# Altium PCB NB2DSK01.PcbDoc (part 10 of 17)
Units mil, origin at the board's own origin, x right, y up, seen from the top; angles counter-clockwise.
Board outline 11815 x 6500.03 mil, 8 copper layers (Top Layer, MidLayer1, MidLayer2, GND, PWR, MidLayer3, MidLayer4, Bottom Layer), stack 74.62 mil thick; 798 components, 1002 nets, 3927 pads, 3182 vias.
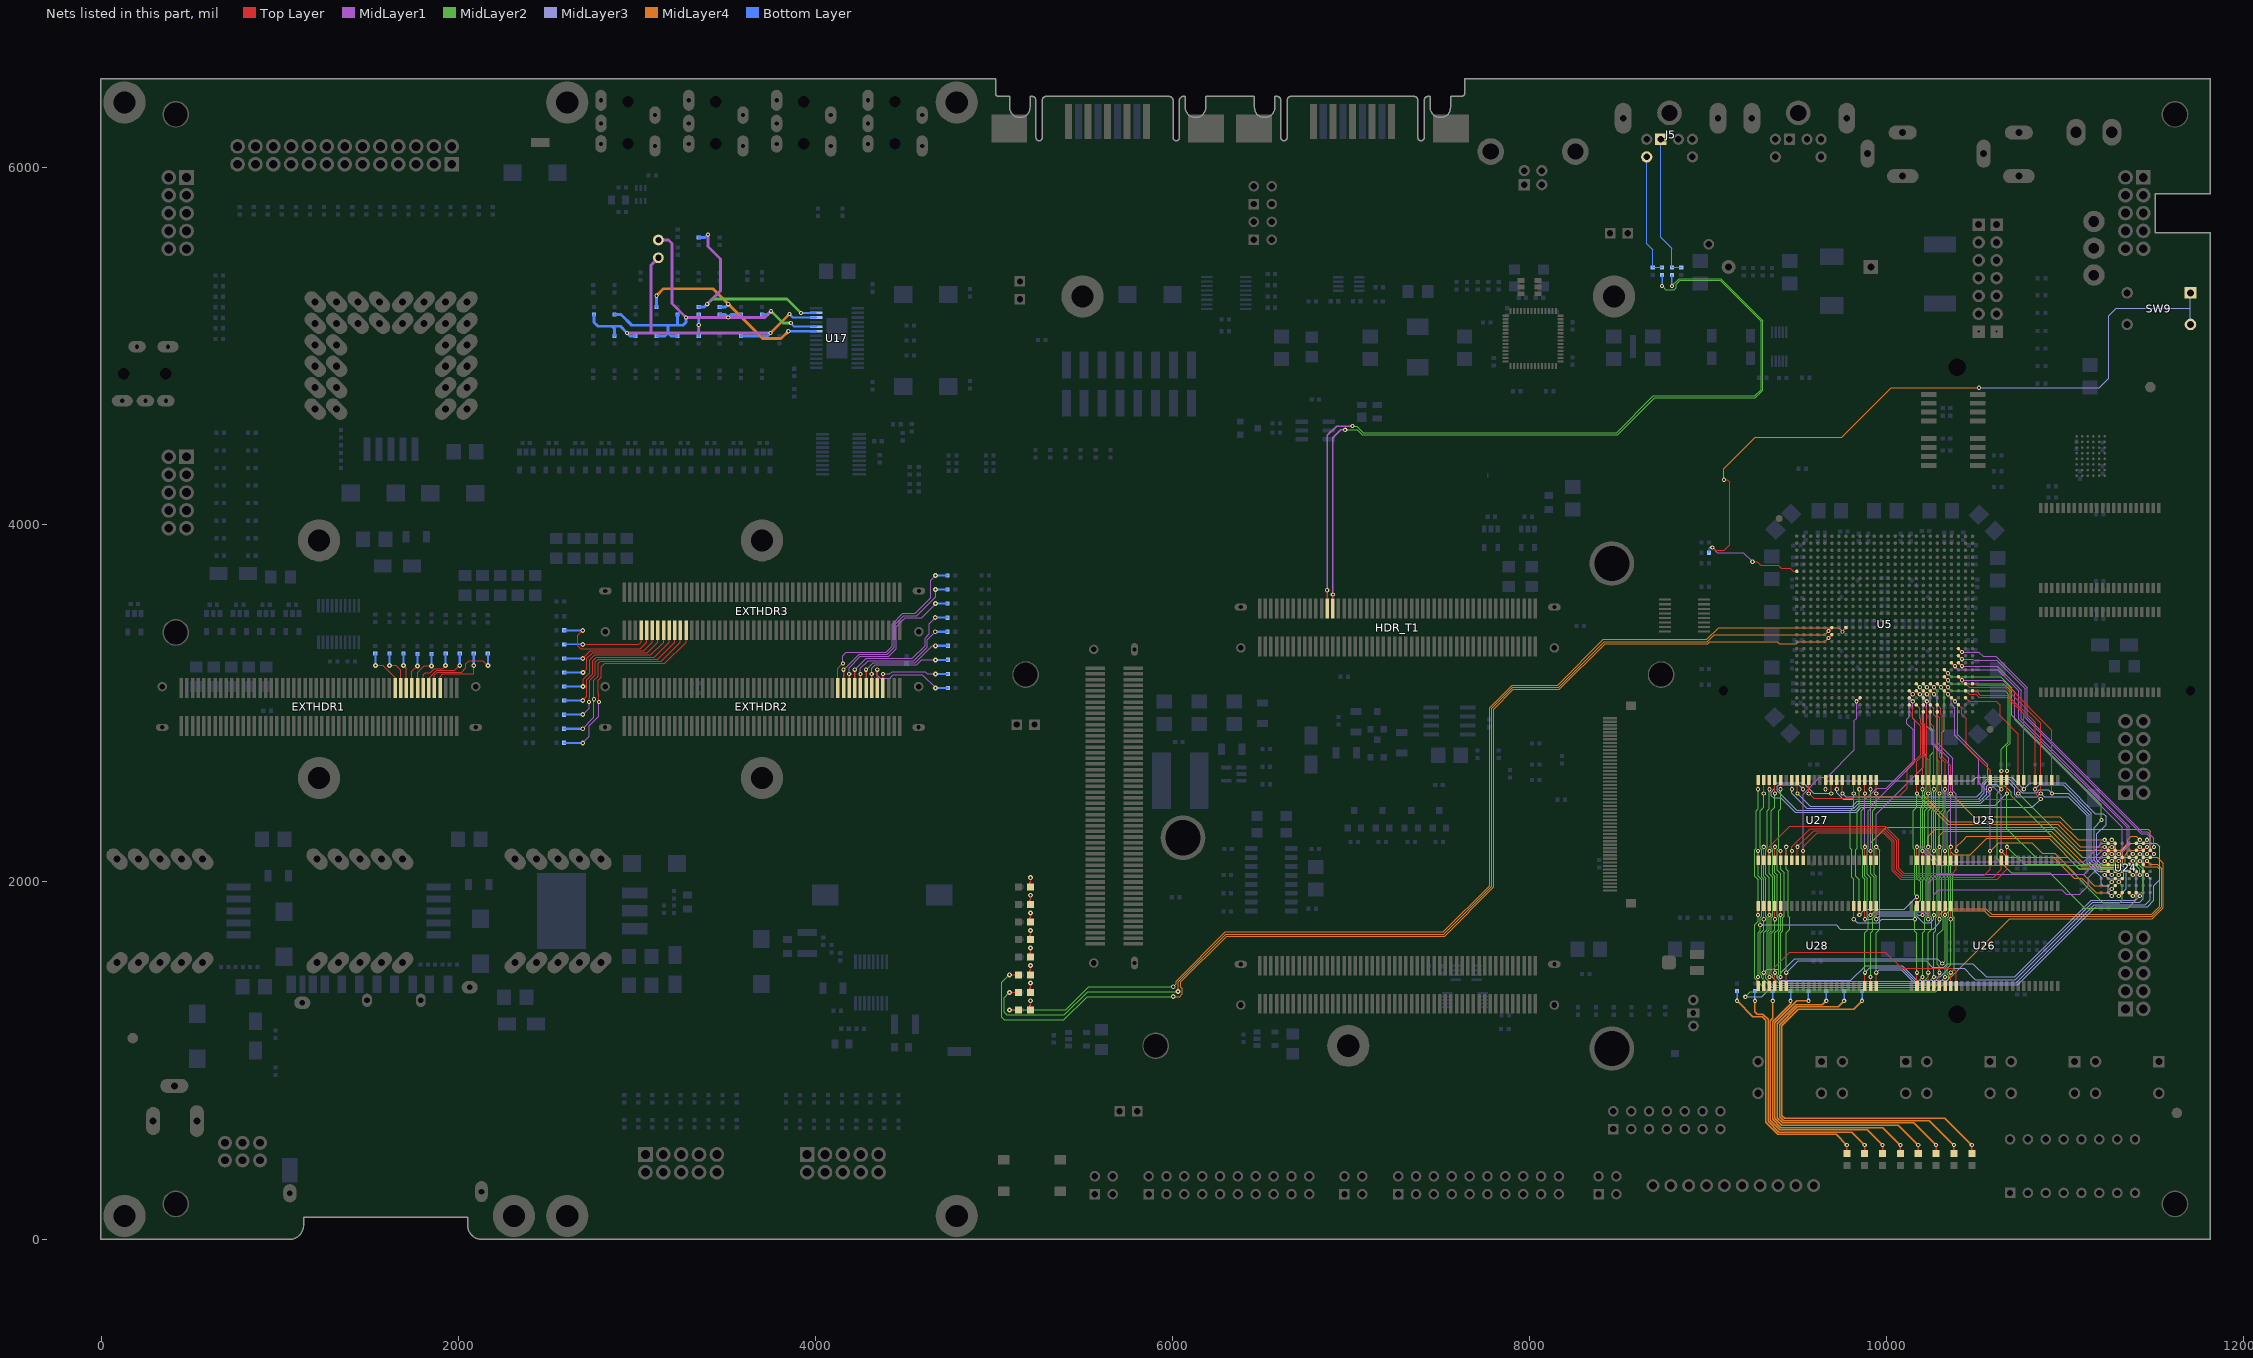
[diagram p16: the nets of this part, all layers, seen from the top]

## Via types
v1: diameter 23.62, hole 11.81, Top Layer to Bottom Layer, tented both sides, 1950 vias
v2: diameter 27.56, hole 11.81, Top Layer to Bottom Layer, tented both sides, 679 vias
v3: diameter 23.62, hole 11.81, Top Layer to Bottom Layer, 194 vias
v4: diameter 31.5, hole 11.81, Top Layer to Bottom Layer, tented both sides, 178 vias
v5: diameter 21.65, hole 11.81, Top Layer to Bottom Layer, tented both sides, 67 vias
v6: diameter 23.62, hole 11.81, Top Layer to Bottom Layer, tented bottom, 53 vias
v7: diameter 26, hole 11.81, Top Layer to Bottom Layer, tented both sides, 21 vias
v8: diameter 26, hole 11.81, Top Layer to Bottom Layer, 13 vias
v9: diameter 28, hole 11.81, Top Layer to Bottom Layer, 8 vias
v10: diameter 25.59, hole 11.81, Top Layer to Bottom Layer, tented both sides, 7 vias
v11: diameter 39.37, hole 11.81, Top Layer to Bottom Layer, tented both sides, 5 vias
v12: diameter 30, hole 11.81, Top Layer to Bottom Layer, 3 vias
v13: diameter 30, hole 11.81, Top Layer to Bottom Layer, tented both sides, 2 vias
v14: diameter 23, hole 11.81, Top Layer to Bottom Layer, tented both sides, 1 vias
v15: diameter 26.56, hole 11.81, Top Layer to Bottom Layer, tented both sides, 1 vias

## Nets (pads, with @x,y where several pads share a name; then routed paths per layer and width w, separated by ;. In a path a pad name is that pad's centre, name@x,y a point inside that pad or via, vN(x,y) a via of type N, cw(c..) or ccw(c..) an arc to the next point about the centre after c; other vN are vias at no path point) (continued)
HOST_LED.L5: LED6.1 U5.R6 | length 6500.6
  Top Layer w5: v2(5086.22,1480.32) LED6.1@5137.8,1480.32
  Top Layer w7.87: v1(9673.23,3366.14) U5.R6@9692.91,3385.83
  MidLayer2 w5: v2(5086.22,1480.32) 5043.59,1437.69 5043.59,1241.49 5057.38,1227.7 5391.93,1227.7 5522.5,1358.27 v2(6003.94,1358.27)
  MidLayer4 w5: v2(6003.94,1358.27) 6039.37,1358.27 6055.12,1374.02 6055.12,1401.58 6047.24,1409.45 6047.24,1440.95 6303.15,1696.85 7523.62,1696.85 7799.21,1972.44 7799.21,2968.5 7909.45,3078.74 8167.03,3078.74 8422.94,3334.65 8996.07,3334.65 9007.88,3346.46 9385.83,3346.46 9397.64,3334.65 9413.39,3334.65 9433.07,3334.65 9492.13,3334.65 9503.94,3346.46 9653.54,3346.46 v1(9673.23,3366.14)
HOST_LED.L6: LED7.1 U5.P6 | length 6342.4
  Top Layer w5: v2(5086.22,1381.89) LED7.1@5137.8,1381.89 ; v2@5090.55,1374.02 v2@5098.43,1381.89
  Top Layer w7.87: v1(9673.23,3405.51) U5.P6@9692.91,3425.2
  MidLayer2 w5: v2(5086.22,1381.89) 5057.38,1353.05 5057.38,1270.65 5072.75,1255.28 5393.51,1255.28 5524.05,1385.83 v2(6031.5,1385.83)
  MidLayer4 w5: v2(6031.5,1385.83) 6031.5,1440.95 6299.21,1708.66 7519.69,1708.66 7787.4,1976.38 7787.4,2972.44 7905.51,3090.55 8162.14,3090.55 8418.05,3346.46 8993.74,3346.46 9033.11,3385.83 9417.32,3385.83 9433.07,3385.83 9653.54,3385.83 v1(9673.23,3405.51)
HOST_LED.L7: LED8.1 U5.P8 | length 6234.9
  Top Layer w5: v2(5086.22,1283.47) LED8.1@5137.8,1283.47
  Top Layer w7.87: v5@9751.97,3405.51 U5.P8@9771.65,3425.2
  MidLayer2 w5: v2(5086.22,1283.47) 5400.69,1283.47 5530.61,1413.39 v2(6003.94,1413.39)
  MidLayer4 w5: v2(6003.94,1413.39) 6019.69,1429.13 6019.69,1444.88 6295.28,1720.47 7515.75,1720.47 7775.59,1980.32 7775.59,2976.38 7901.57,3102.36 8157.25,3102.36 8413.15,3358.27 8991.41,3358.27 9058.34,3425.2 9417.32,3425.2 9433.07,3425.2 9732.28,3425.2 v5@9751.97,3403.15
  other v5: 9751.97,3401.58
HOST_RESET_SW: R159.2 SW9.1 SW9.2 U5.F1 | length 4508.5
  Top Layer w5: v1(9023.23,3873.62) 9038.4,3858.45 9089.45,3858.45 9120,3889 9120,4241 9108,4253 v1(9088,4253) ; v2(9248.8,3793.33) 9274.66,3793.33 9294.54,3773.45 9391.68,3773.45 9409.23,3755.91 9460.63,3755.91 9476.38,3740.16 U5.F1@9496.06,3740.16
  MidLayer1 w5: v1(9023.23,3873.62) 9051.85,3845 9197.13,3845 v2(9248.8,3793.33)
  MidLayer4 w5: v1(9088,4253) 9088,4315 9264,4491 9749,4491 10026,4768 v1(10517,4768)
  MidLayer3 w5: v1(10517,4768) 11190,4768 11243,4821 11243,5171 11286,5214 11700.79,5214 ; SW9.2@11700.79,5122.51 SW9.1@11700.79,5299.67
  Bottom Layer w5: R159.2@9004.46,3843.38 9004.46,3869.06 9009.02,3873.62 v1(9023.23,3873.62)
IN.LEFT: R109.2 R112.2 R113.2 R114.2 R115.2 R116.1 TP13.1 U17.12 | length 2249.7
  MidLayer1 w15.75: v1(2944.88,5074.8) 3078.8,5074.8 ; TP13.1@3120.73,5495.67 3078.8,5453.74 3078.8,5074.8 ; 3346.46,5076.95 v1(3346.46,5119.64) ; v1(3748.03,5074.8) 3078.8,5074.8
  MidLayer4 w15.75: v1(3748.03,5074.8) v1(3854.33,5181.1)
  Bottom Layer w11.81: v1(3854.33,5181.1) 3874.02,5161.42 U17.12@4003.94,5161.42
  Bottom Layer w15.75: R115.2@2759.84,5177.64 2759.84,5133.95 2781.64,5112.15 2860.44,5112.15 ; R109.2@2874.02,5058.58 2874.02,5098.58 2860.44,5112.15 ; R112.2@2992.13,5058.58 2961.1,5058.58 v1(2944.88,5074.8) 2907.54,5112.15 2860.44,5112.15 ; R113.2@3346.46,5058.58 v1(3346.46,5119.64) R116.1@3346.46,5177.64 ; R114.2@3582.68,5058.58 3731.81,5058.58 v1(3748.03,5074.8)
IN.RIGHT: R119.2 R120.1 R121.2 R124.2 R125.2 R126.2 R129.2 TP14.1 U17.10 | length 2193.7
  MidLayer1 w15.75: TP14.1@3120.73,5595.67 3177.03,5595.67 3196.85,5575.85 3196.85,5240.16 v1(3275.59,5161.42) 3716.54,5161.42 v1(3751.97,5196.85)
  MidLayer2 w15.75: v1(3751.97,5196.85) 3818.9,5129.92 v1(3862.2,5129.92)
  Bottom Layer w11.81: v1(3862.2,5129.92) 3881.89,5110.24 U17.10@4003.94,5110.24
  Bottom Layer w15.75: R121.2@2874.02,5177.64 2911.46,5177.64 2970.99,5118.11 3259.22,5118.11 3275.59,5134.48 v1(3275.59,5161.42) ; R124.2@3110.24,5058.58 3157.45,5058.58 3174.06,5075.2 ; 3174.06,5118.11 3174.06,5075.2 ; R125.2@3228.35,5058.58 3190.68,5058.58 3174.06,5075.2 ; 3228.35,5119.6 R119.2@3228.35,5177.64 ; R120.1@3464.57,5177.64 3495.59,5177.64 v1(3511.81,5161.42) 3528.03,5177.64 R129.2@3582.68,5177.64 ; R126.2@3700.79,5177.64 3732.76,5177.64 v1(3751.97,5196.85)
JTAG.DETECTPBA: EXTHDR1.23 R207.2 | length 263.6
  Top Layer w5: v2(1535.43,3212.6) 1577.4,3212.6 1645.67,3144.33 EXTHDR1.23@1645.67,3086.61
  Bottom Layer w11.81: v2(1535.43,3212.6) R207.2@1535.43,3280
JTAG.DETECTPBB: EXTHDR2.23 R225.2 | length 1097.3
  Top Layer w5: EXTHDR2.23@4125.98,3086.61 4125.98,3196.85 v5(4153.54,3224.41)
  MidLayer1 w5: v5(4153.54,3224.41) 4153.54,3268.23 4172.72,3287.4 4397.64,3287.4 4429.13,3318.9 4429.13,3444.88 4488.19,3503.94 4559.06,3503.94 4645.67,3590.55 4645.67,3688.98 v2(4673.23,3716.54)
  Bottom Layer w11.81: v2(4673.23,3716.54) R225.2@4740.63,3716.54
JTAG.DETECTPBC: EXTHDR3.23 R243.2 | length 1176.8
  Top Layer w5: v1(2787.4,3007.87) 2787.4,3051.18 2783.46,3055.12 2783.46,3129.92 2799.21,3145.67 2799.21,3204.73 2818.9,3224.41 3157.48,3224.41 3275.59,3342.52 EXTHDR3.23@3275.59,3409.45
  MidLayer1 w5: v2(2696.85,2779.53) 2732.28,2814.96 2732.28,2874.02 2787.4,2929.13 v1(2787.4,3007.87)
  Bottom Layer w11.81: R243.2@2591.26,2779.53 v2(2696.85,2779.53)
JTAG.HARD.TCKPBA: EXTHDR1.11 R197.2 | length 324.2
  Top Layer w5: EXTHDR1.11@1834.65,3086.61 1834.65,3140.13 1879.87,3185.36 1980.63,3185.36 v2(2007.87,3212.6)
  Bottom Layer w11.81: v2(2007.87,3212.6) R197.2@2007.87,3280
JTAG.HARD.TCKPBB: EXTHDR2.11 R215.2 | length 557.4
  Top Layer w7.87: EXTHDR2.11@4314.96,3086.61 v1(4314.96,3165.36)
  MidLayer1 w5: v1(4314.96,3165.36) 4314.96,3196.85 4334.65,3216.54 4566.93,3216.54 4594.49,3244.1 v2(4673.23,3244.1)
  Bottom Layer w11.81: v2(4673.23,3244.1) R215.2@4742.6,3244.1
JTAG.HARD.TCKPBC: EXTHDR3.11 R233.2 | length 597.8
  Top Layer w5: v2(2696.85,3251.97) 2740.16,3295.28 3039.37,3295.28 3086.61,3342.52 EXTHDR3.11@3086.61,3409.45
  Bottom Layer w11.81: R233.2@2593.23,3251.97 v2(2696.85,3251.97)
JTAG.HARD.TDIPBA: EXTHDR1.7 R194.2 | length 372.4
  Top Layer w5: EXTHDR1.7@1897.64,3086.61 1897.64,3149.61 1913.39,3165.36 2085.36,3165.36 2086.61,3166.61 v2(2086.61,3212.6)
  Bottom Layer w11.81: v2(2086.61,3212.6) R194.2@2086.61,3280
JTAG.HARD.TDIPBB: EXTHDR2.7 R212.2 | length 453.2
  Top Layer w7.87: EXTHDR2.7@4377.95,3086.61 v1(4377.95,3165.36)
  MidLayer1 w5: v1(4377.95,3165.36) 4417.32,3165.36 4429.13,3177.17 4614.17,3177.17 4625.98,3165.36 v2(4673.23,3165.36)
  Bottom Layer w11.81: v2(4673.23,3165.36) R212.2@4742.6,3165.35
JTAG.HARD.TDIPBC: EXTHDR3.7 R230.2 | length 499
  Top Layer w5: v2(2696.85,3330.71) 3011.81,3330.71 3023.62,3342.52 EXTHDR3.7@3023.62,3409.45
  Bottom Layer w11.81: R230.2@2596.46,3333.47 v2(2696.85,3330.71)
JTAG.HARD.TDOPBA: EXTHDR1.9 R195.2 | length 496.1
  Top Layer w5: EXTHDR1.9@1866.14,3086.61 1866.14,3157.48 1884.02,3175.36 2018.36,3175.36 2043,3200 2043,3222.16 2061,3240.16 2137.8,3240.16 v2(2165.35,3212.6)
  Bottom Layer w11.81: v2(2165.35,3212.6) R195.2@2165.35,3280
JTAG.HARD.TDOPBB: EXTHDR2.9 R213.2 | length 575.7
  Top Layer w7.87: EXTHDR2.9@4346.46,3086.61 v1(4346.46,3188.98)
  MidLayer1 w5: v1(4346.46,3188.98) 4346.46,3157.48 4362.2,3141.73 4417.32,3141.73 4437.01,3161.42 4598.43,3161.42 v2(4673.23,3086.61)
  Bottom Layer w11.81: v2(4673.23,3086.61) R213.2@4742.6,3086.61
JTAG.HARD.TDOPBC: EXTHDR3.9 R231.2 | length 675.6
  Top Layer w5: v2(2696.85,3409.45) 2669.29,3381.89 2669.29,3322.84 2685.04,3307.09 3019.68,3307.09 3055.12,3342.52 EXTHDR3.9@3055.12,3409.45
  Bottom Layer w11.81: R231.2@2593.23,3409.45 v2(2696.85,3409.45)
JTAG.HARD.TMSPBA: EXTHDR1.13 R196.2 | length 289.2
  Top Layer w5: EXTHDR1.13@1803.15,3086.61 1803.15,3161.15 1815,3173 1842.85,3173 1865.21,3195.36 1911.89,3195.36 v2(1929.13,3212.6)
  Bottom Layer w11.81: v2(1929.13,3212.6) R196.2@1929.13,3280
JTAG.HARD.TMSPBB: EXTHDR2.13 R214.2 | length 616.9
  Top Layer w7.87: EXTHDR2.13@4283.47,3086.61 v1(4283.47,3188.98)
  MidLayer1 w5: v1(4283.47,3188.98) 4322.84,3228.35 4559.06,3228.35 4653.54,3322.84 v2(4673.23,3322.84)
  Bottom Layer w11.81: v2(4673.23,3322.84) R214.2@4742.6,3322.84
JTAG.HARD.TMSPBC: EXTHDR3.13 R232.2 | length 690.6
  Top Layer w5: v2(2698.82,3173.23) 2720.47,3194.88 2720.47,3251.97 2751.97,3283.47 3059.05,3283.47 3118.11,3342.52 EXTHDR3.13@3118.11,3409.45
  Bottom Layer w11.81: R232.2@2596.06,3171.65 v2@2696.85,3173.23
JTAG.SOFT.TCKPBA: EXTHDR1.19 R205.2 | length 199.9
  Top Layer w5: v2(1692.91,3212.6) 1708.66,3196.85 EXTHDR1.19@1708.66,3086.61
  Bottom Layer w11.81: v2(1692.91,3212.6) R205.2@1692.91,3280
JTAG.SOFT.TCKPBB: EXTHDR2.19 R223.2 | length 885.7
  Top Layer w7.87: EXTHDR2.19@4188.98,3086.61 v1(4188.98,3165.36)
  MidLayer1 w5: v1(4188.98,3165.36) 4188.98,3200.79 4251.97,3263.78 4409.45,3263.78 4452.76,3307.09 4452.76,3429.13 4503.94,3480.32 4594.49,3480.32 v2(4673.23,3559.06)
  Bottom Layer w11.81: v2(4673.23,3559.06) R223.2@4740.63,3559.06
JTAG.SOFT.TCKPBC: EXTHDR3.19 R241.2 | length 987.7
  Top Layer w5: v1(2732.28,3007.87) 2732.28,3031.5 2736.22,3035.43 2736.22,3129.92 2767.72,3161.42 2767.72,3232.28 2783.46,3248.03 3118.11,3248.03 3212.6,3342.52 EXTHDR3.19@3212.6,3409.45
  MidLayer1 w5: v2(2696.85,2937.01) 2732.28,2972.44 v1(2732.28,3007.87)
  Bottom Layer w11.81: R241.2@2591.26,2937.01 v2(2696.85,2937.01)
JTAG.SOFT.TDIPBA: EXTHDR1.15 R202.2 | length 248.5
  Top Layer w5: EXTHDR1.15@1771.65,3086.61 1771.65,3173.65 1808.63,3210.63 v2(1850.39,3210.63)
  Bottom Layer w11.81: v2(1850.39,3210.63) R202.2@1850.39,3278.03
JTAG.SOFT.TDIPBB: EXTHDR2.15 R220.2 | length 707.9
  Top Layer w7.87: EXTHDR2.15@4251.97,3086.61 v1(4251.97,3165.36)
  MidLayer1 w5: v1(4251.97,3165.36) 4251.97,3196.85 4295.28,3240.16 4551.18,3240.16 4625.98,3314.96 4625.98,3356.3 v2(4671.26,3401.58)
  Bottom Layer w11.81: v2(4671.26,3401.58) R220.2@4740.63,3401.58
JTAG.SOFT.TDIPBC: EXTHDR3.15 R238.2 | length 791.8
  Top Layer w5: v2(2698.82,3094.49) 2698.82,3135.83 2736.22,3173.23 2736.22,3244.1 2763.78,3271.65 3078.74,3271.65 3149.61,3342.52 EXTHDR3.15@3149.61,3409.45
  Bottom Layer w11.81: R238.2@2593.23,3094.49 v2(2698.82,3094.49)
JTAG.SOFT.TDOPBA: EXTHDR1.17 R203.2 | length 204.5
  Top Layer w5: EXTHDR1.17@1740.16,3086.61 1740.16,3179.13 v2(1771.65,3210.63)
  Bottom Layer w11.81: v2(1771.65,3210.63) R203.2@1771.65,3278.03
JTAG.SOFT.TDOPBB: EXTHDR2.17 R221.2 | length 802
  Top Layer w7.87: EXTHDR2.17@4220.47,3086.61 v1(4220.47,3188.98)
  MidLayer1 w5: v1(4220.47,3188.98) 4283.46,3251.97 4543.31,3251.97 4614.17,3322.84 4614.17,3366.14 4637.8,3389.76 4637.8,3446.85 v2(4671.26,3480.32)
  Bottom Layer w11.81: v2(4671.26,3480.32) R221.2@4740.63,3480.32
JTAG.SOFT.TDOPBC: EXTHDR3.17 R239.2 | length 891.3
  Top Layer w5: v2(2696.85,3015.75) 2720.47,3039.37 2720.47,3133.86 2751.97,3165.36 2751.97,3240.16 2771.65,3259.84 3098.42,3259.84 3181.1,3342.52 EXTHDR3.17@3181.1,3409.45
  Bottom Layer w11.81: R239.2@2593.23,3015.75 v2(2696.85,3015.75) v2@2698.82,3015.75
JTAG.SOFT.TMSPBA: EXTHDR1.21 R204.2 | length 240.7
  Top Layer w5: v2(1614.17,3212.6) 1650.4,3212.6 1677.17,3185.83 EXTHDR1.21@1677.17,3086.61
  Bottom Layer w11.81: v2(1614.17,3212.6) R204.2@1614.17,3280
JTAG.SOFT.TMSPBB: EXTHDR2.21 R222.2 | length 1021.6
  Top Layer w7.87: EXTHDR2.21@4157.48,3086.61 v1(4157.48,3188.98)
  MidLayer1 w5: v1(4157.48,3188.98) 4244.09,3275.59 4401.57,3275.59 4440.95,3314.96 4440.95,3437.01 4496.06,3492.13 4566.93,3492.13 4673.23,3598.43 v2(4673.23,3637.8)
  Bottom Layer w5: v2@4685.04,3637.8 R222.2@4740.63,3637.8
  Bottom Layer w11.81: v2(4673.23,3637.8) R222.2@4740.63,3637.8
JTAG.SOFT.TMSPBC: EXTHDR3.21 R240.2 | length 1084.1
  Top Layer w5: v1(2759.84,3023.62) 2759.84,3129.92 2783.46,3153.54 2783.46,3224.41 2795.28,3236.22 3137.79,3236.22 3244.09,3342.52 EXTHDR3.21@3244.09,3409.45
  MidLayer1 w5: v2(2696.85,2858.27) 2759.84,2921.26 v1(2759.84,3023.62)
  Bottom Layer w11.81: R240.2@2591.26,2858.27 v2(2696.85,2858.27)
KEYBOARD#.CLOCK: J5.5 R84.2 R87.2 | length 692.4
  Bottom Layer w5: J5.5@8655.51,6061.02 8655.51,5575.5 8689.73,5541.28 R84.2@8689.73,5441.69 R87.2@8741.35,5441.69
  Bottom Layer w7.87: R87.2@8736.22,5446.82 R87.2@8741.35,5441.69
KEYBOARD#.DATA: J5.1 R85.2 R86.2 | length 797.6
  Bottom Layer w5: J5.1@8736.51,6159.45 J5.1@8734.25,6159.45 8734.25,5610.9 8796.9,5548.25 R86.2@8796.9,5441.69 R85.2@8848.51,5441.69
KEYBOARD.CLOCK: HDR_T1.26 R87.1 | length 4671.4
  Top Layer w7.87: HDR_T1.26@6866.14,3531.5 v1(6866.14,3633.86)
  MidLayer1 w7.87: v1(6866.14,3633.86) 6866.14,4501.06 6918.54,4553.46 v1(7008.08,4553.46)
  MidLayer2 w5: v1(7008.08,4553.46) 7030.93,4553.46 7067.93,4516.45 8486.68,4516.45 8693.23,4723 9261.86,4723 9296,4757.14 9296,5140 9066.3,5369.7 8842.9,5369.7 8822.2,5349 8822.2,5329.2 8811.1,5318.1 8761.08,5318.1 v1(8741.35,5337.84)
  Bottom Layer w7.87: v1(8741.35,5337.84) R87.1@8741.35,5399.33
KEYBOARD.DATA: HDR_T1.28 R86.1 | length 4574.9
  Top Layer w7.87: HDR_T1.28@6897.64,3531.5 v1(6897.64,3610.24)
  MidLayer1 w7.87: v1(6897.64,3610.24) 6897.64,4487.66 6942.16,4532.18 v1(6966.71,4532.18)
  MidLayer2 w5: v1(6966.71,4532.18) 7033.69,4532.18 7062.42,4503.45 8493.68,4503.45 8701.23,4711 9264,4711 9306,4753 9306,5144.14 9070.44,5379.7 8838.76,5379.7 v1(8796.9,5337.84)
  Bottom Layer w7.87: v1(8796.9,5337.84) R86.1@8796.9,5399.33
LED#00: LED9.2 R100.2 | length 2244.7
  Top Layer w7.87: LED9.2@10476.38,479.41 v1(10476.38,526.65)
  MidLayer4 w8: v1(9861.4,1334.51) 9813.89,1287 9503.92,1287 9413,1196.08 9413,691.69 9427.69,677 10326.03,677 v1(10476.38,526.65)
  Bottom Layer w8: v1(9861.4,1334.51) R100.2@9861.4,1390.1
LED#0: LED1.2 R92.2 | length 105.3
  Top Layer w5: LED1.2@5204.73,1972.44 v2(5204.73,2024.02)
  Bottom Layer w5: R92.2@5199.53,1972.44 5199.53,1995.53 5204.73,2000.73 v2(5204.73,2024.02)
LED#1: LED2.2 R93.2 | length 105.3
  Top Layer w5: LED2.2@5204.73,1874.02 v2(5204.73,1925.59)
  Bottom Layer w5: R93.2@5199.53,1874.02 5199.53,1897.11 5204.73,1902.31 v2(5204.73,1925.59)
LED#01: LED10.2 R101.2 | length 2077
  Top Layer w7.87: LED10.2@10376.38,479.41 v1(10376.38,526.65)
  MidLayer4 w8: v1(9761.4,1334.51) 9726.89,1300 9498.54,1300 9400,1201.46 9400,686.31 9422.31,664 10239.03,664 v1(10376.38,526.65)
  Bottom Layer w8: v1(9761.4,1334.51) R101.2@9761.4,1390.1
LED#2: LED3.2 R94.2 | length 105.3
  Top Layer w5: LED3.2@5204.73,1775.59 v2(5204.73,1827.17)
  Bottom Layer w5: R94.2@5199.53,1775.59 5199.53,1798.68 5204.73,1803.88 v2(5204.73,1827.17)
LED#02: LED11.2 R102.2 | length 1909.3
  Top Layer w7.87: LED11.2@10276.38,479.41 v1(10276.38,526.65)
  MidLayer4 w8: v1(9661.4,1334.51) 9639.89,1313 9493.15,1313 9387,1206.85 9387,680.92 9416.92,651 10152.03,651 v1(10276.38,526.65)
  Bottom Layer w8: v1(9661.4,1334.51) R102.2@9661.4,1390.1
LED#3: LED4.2 R95.2 | length 105.3
  Top Layer w5: LED4.2@5204.73,1677.17 v2(5204.73,1728.74)
  Bottom Layer w5: R95.2@5199.53,1677.17 5199.53,1700.26 5204.73,1705.46 v2(5204.73,1728.74)
LED#03: LED12.2 R103.2 | length 1741.6
  Top Layer w7.87: LED12.2@10176.38,479.41 v1(10176.38,526.65)
  MidLayer4 w8: v1(9561.4,1334.51) 9496.28,1334.51 9374,1212.23 9374,675.54 9411.54,638 10065.03,638 v1(10176.38,526.65)
  Bottom Layer w8: v1(9561.4,1334.51) R103.2@9561.4,1390.1
LED#4: LED5.2 R96.2 | length 105.3
  Top Layer w5: LED5.2@5204.73,1578.74 v2(5204.73,1630.32)
  Bottom Layer w5: R96.2@5199.53,1578.74 5199.53,1601.83 5204.73,1607.03 v2(5204.73,1630.32)
LED#04: LED13.2 R104.2 | length 1583.6
  Top Layer w7.87: LED13.2@10076.38,479.41 v1(10076.38,526.65)
  MidLayer4 w8: v1(9461.4,1334.51) 9461.4,1318.01 9361,1217.62 9361,670.15 9406.15,625 9978.03,625 v1(10076.38,526.65)
  Bottom Layer w8: v1(9461.4,1334.51) R104.2@9461.4,1390.1
LED#5: LED6.2 R97.2 | length 105.3
  Top Layer w5: LED6.2@5204.73,1480.32 v2(5204.73,1531.89)
  Bottom Layer w5: R97.2@5199.53,1480.32 5199.53,1503.41 5204.73,1508.61 v2(5204.73,1531.89)
LED#05: LED14.2 R105.2 | length 1463.7
  Top Layer w7.87: LED14.2@9976.38,479.41 v1(9976.38,526.65)
  MidLayer4 w8: v1(9361.4,1334.51) 9361.4,1236.4 9348,1223 9348,664.77 9400.77,612 9891.03,612 v1(9976.38,526.65)
  Bottom Layer w8: v1(9361.4,1334.51) R105.2@9361.4,1390.1
LED#6: LED7.2 R98.2 | length 105.3
  Top Layer w5: LED7.2@5204.73,1381.89 v2(5204.73,1433.47)
  Bottom Layer w5: R98.2@5199.53,1381.89 5199.53,1404.98 5204.73,1410.18 v2(5204.73,1433.47)
LED#06: LED15.2 R106.2 | length 1424.1
  Top Layer w7.87: LED15.2@9876.38,479.41 v1(9876.38,526.65)
  MidLayer4 w8: v1(9261.4,1334.51) 9261.4,1272 9273.4,1260 9306.38,1260 9335,1231.38 9335,659.38 9395.38,599 9804.03,599 v1(9876.38,526.65)
  Bottom Layer w8: v1(9261.4,1334.51) R106.2@9261.4,1390.1
LED#7: LED8.2 R99.2 | length 105.3
  Top Layer w5: LED8.2@5204.73,1283.47 v2(5204.73,1335.04)
  Bottom Layer w5: R99.2@5199.53,1283.47 5199.53,1306.56 5204.73,1311.76 v2(5204.73,1335.04)
LED#07: LED16.2 R107.2 | length 1387.5
  Top Layer w7.87: LED16.2@9776.38,479.41 v1(9776.38,526.65)
  MidLayer4 w8: v1(9161.4,1334.51) 9249.91,1246 9302,1246 9322,1226 9322,654 9390,586 9717.03,586 v1(9776.38,526.65)
  Bottom Layer w8: v1(9161.4,1334.51) R107.2@9161.4,1390.1
LINEAOUT_L: R116.2 R130.1 U17.13 | length 1221
  MidLayer1 w15.75: v1(3393.7,5236.22) 3468.5,5311.02 3468.5,5488.19 3397.64,5559.06 v1(3397.64,5625.98) ; v1@3397.64,5236.22 v1@3397.64,5240.16
  MidLayer2 w15.75: v1(3393.7,5236.22) 3423.23,5265.75 3840.55,5265.75 v1(3919.29,5187.01)
  Bottom Layer w11.81: v1(3919.29,5187.01) U17.13@4003.94,5187.01
  Bottom Layer w15.75: R116.2@3346.46,5220 3377.48,5220 v1(3393.7,5236.22) ; R130.1@3346.46,5609.76 3381.42,5609.76 v1(3397.64,5625.98)
LINEAOUT_R: R120.2 R127.1 U17.9 | length 1160.3
  MidLayer4 w15.75: v1(3110.24,5283.47) 3149.61,5322.84 3425.2,5322.84 v1(3511.81,5236.22) 3704.72,5043.31 3807.09,5043.31 v1(3848.43,5084.65)
  Bottom Layer w11.81: v1(3848.43,5084.65) U17.9@4003.94,5084.65
  Bottom Layer w15.75: R127.1@3110.24,5220 v1(3110.24,5283.47) ; R120.2@3464.57,5220 3495.59,5220 v1(3511.81,5236.22)
MEM.BUS_A1: U5.Y22 U24.E2 | length 1986
  Top Layer w5: v1(11220.47,2039.19) U24.E2@11240.16,2058.88
  Top Layer w7.87: U5.Y22@10322.83,3188.98 v1(10342.52,3169.29)
  MidLayer2 w5: v1(10342.52,3169.29) 10362.21,3149.61 10543.31,3149.61 10566.93,3149.61 10637.8,3149.61 10700.79,3086.61 10700.79,2933.07 10984.25,2649.61 11202.5,2431.36 v1(11202.5,2346.7)
  MidLayer3 w5: v1(11202.5,2346.7) 11160.68,2304.88 11160.68,2121.95 11198.68,2083.95 11308.59,2083.95 11327.76,2064.78 11327.76,2025.41 11321.85,2019.51 11240.16,2019.51 v1(11220.47,2039.19)
MEM.BUS_A2: U5.AF20 U24.D2 U25.23 U26.23 U27.1 U28.1 | length 3687.8
  Top Layer w5: v1(9940.94,1791.34) U28.1@9940.95,1866.14 ; v1(9940.94,2496.06) U27.1@9940.95,2570.87 ; U5.AF20@10244.09,2952.76 10244.09,2889.76 10263.78,2870.08 U25.23@10263.78,2570.87 v1(10263.78,2519.69) ; v1(10263.78,1814.96) U26.23@10263.78,1866.14 ; v1(11220.47,2117.93) U24.D2@11240.16,2098.25
  MidLayer1 w5: v1(10263.78,1814.96) 10263.78,1929.5 10290.97,1956.69 10979.6,1956.69 11004.69,1931.6 11079.8,1931.6 11127.6,1979.4 11127.6,2025.06 v1(11220.47,2117.93)
  MidLayer2 w5: v1(9940.94,1791.34) 9940.94,2031.5 9929.13,2043.31 9929.13,2181.1 9921.26,2188.98 9921.26,2397.64 9940.94,2417.32 v1(9940.94,2496.06) ; v1(10263.78,1814.96) 10263.78,2015.75 10244.1,2035.43 10244.1,2181.1 10251.97,2188.98 10251.97,2397.64 10263.78,2409.45 v1(10263.78,2519.69)
  MidLayer3 w5: v1(9940.94,1791.34) 9960.63,1811.02 10165.35,1811.02 10204.72,1771.65 10244.09,1771.65 10263.78,1791.34 v1(10263.78,1814.96)
MEM.BUS_A3: U5.AE19 U24.C2 U25.24 U26.24 U27.2 U28.2 | length 3775
  Top Layer w5: v1(9909.45,1814.96) U28.2@9909.45,1866.14 ; v1(9909.45,2519.69) U27.2@9909.45,2570.87 ; U5.AE19@10204.72,2992.13 10224.41,2972.44 10224.41,2693.44 10232.28,2685.56 U25.24@10232.28,2570.87 v1(10232.28,2496.06) ; v1(10232.28,1791.34) U26.24@10232.28,1866.14 ; v1(11220.47,2157.3) U24.C2@11240.16,2137.62
  MidLayer1 w5: v1(10232.28,1791.34) 10232.28,1992.56 10283.03,2043.31 11106.48,2043.31 11188.98,2125.81 v1(11220.47,2157.3)
  MidLayer2 w5: v1(9909.45,1814.96) 9909.45,2023.62 9889.76,2043.31 9889.76,2181.1 9897.64,2188.98 9897.64,2397.64 9909.45,2409.45 v1(9909.45,2519.69) ; v1(10232.28,1791.34) 10232.28,2011.81 10220.47,2023.62 10220.47,2181.1 10212.6,2188.98 10212.6,2397.64 10232.28,2417.32 v1(10232.28,2496.06)
  MidLayer3 w5: v1(9909.45,1814.96) 9929.13,1834.65 10212.6,1834.65 10232.28,1814.96 v1(10232.28,1791.34)
MEM.BUS_A4: U5.AF19 U24.A2 U25.25 U26.25 U27.3 U28.3 | length 3606.7
  Top Layer w5: v1(9877.95,1791.34) U28.3@9877.95,1866.14 ; v1(9877.95,2496.06) U27.3@9877.95,2570.87 ; v1(10200.79,1814.96) U26.25@10200.79,1866.14 ; v1(10200.79,2519.69) U25.25@10200.79,2570.87 10200.79,2694.5 10212.68,2706.4 10212.68,2884.54 10204.72,2892.5 U5.AF19@10204.72,2952.76 ; v1(11220.47,2236.04) U24.A2@11240.16,2216.36
  MidLayer2 w5: v1(9877.95,1791.34) 9877.95,2015.75 9866.14,2027.56 9866.14,2181.1 9858.27,2188.98 9858.27,2397.64 9877.95,2417.32 v1(9877.95,2496.06) ; v1(10200.79,1814.96) 10200.79,2007.87 10181.1,2027.56 10181.1,2181.1 10188.98,2188.98 10188.98,2417.32 10200.79,2429.14 v1(10200.79,2519.69)
  MidLayer4 w5: v1(10200.79,2519.69) 10200.79,2488.19 10350.39,2338.58 10968.5,2338.58 11071.04,2236.04 v1(11220.47,2236.04)
  MidLayer3 w5: v1(9877.95,1791.34) 9913.39,1791.34 9944.88,1822.83 10169.29,1822.83 10177.17,1814.96 v1(10200.79,1814.96)
MEM.BUS_A5: U5.AE18 U24.B2 U25.26 U26.26 U27.4 U28.4 | length 3563.2
  Top Layer w5: v1(9846.46,1814.96) U28.4@9846.46,1866.14 ; v1(9846.46,2519.69) U27.4@9846.46,2570.87 ; U5.AE18@10165.35,2992.13 10185.04,2972.44 10185.04,2916.44 10190.83,2910.65 10190.83,2889.66 10202.68,2877.81 10202.68,2710.54 10169.29,2677.15 U25.26@10169.29,2570.87 v1(10169.29,2496.06) ; U26.26@10169.29,1866.14 v1(10169.29,1917.32) ; v1(11220.47,2196.67) U24.B2@11240.16,2176.99
  MidLayer2 w5: v1(9846.46,1814.96) 9846.46,2011.81 9826.77,2031.5 9826.77,2181.1 9834.65,2188.98 9834.65,2397.64 9846.46,2409.45 v1(9846.46,2519.69) ; v1(10169.29,1917.32) 10157.48,1929.13 10157.48,2181.1 10149.61,2188.98 10149.61,2397.64 10169.29,2417.32 v1(10169.29,2496.06)
  MidLayer4 w5: v1(10169.29,2496.06) 10342.52,2322.84 10956.69,2322.84 11082.86,2196.67 v1(11220.47,2196.67)
  MidLayer3 w5: v1(9846.46,1814.96) 9877.95,1846.46 10098.43,1846.46 v1(10169.29,1917.32)
MEM.BUS_A6: U5.AE17 U24.D3 U25.29 U26.29 U27.5 U28.5 | length 4281.3
  Top Layer w5: v1(9814.96,1791.34) U28.5@9814.96,1866.14 ; U27.5@9814.96,2570.87 v1(9814.96,2496.06) 9834.64,2476.38 10066.93,2476.38 10114.17,2523.62 10114.17,2636.17 10191.68,2713.68 10191.68,2871.31 10145.67,2917.32 10145.67,2972.44 U5.AE17@10125.98,2992.13 ; U26.29@10169.29,1417.32 v1(10169.29,1492.13) ; U25.29@10169.29,2122.05 v1(10169.29,2196.85) ; v1(11259.84,2117.93) U24.D3@11279.53,2098.25
  MidLayer1 w5: v1(10169.29,2196.85) 10204.72,2196.85 10287.4,2114.17 11102.54,2114.17 11204.72,2216.36 11271.65,2216.36 11279.53,2208.49 11279.53,2137.62 v1(11259.84,2117.93)
  MidLayer2 w5: v1(9814.96,1791.34) 9814.96,2015.75 9803.15,2027.56 9803.15,2181.1 9795.28,2188.98 9795.28,2397.64 9814.96,2417.32 v1(9814.96,2496.06) ; v1(10169.29,1492.13) 10169.29,1712.6 10157.48,1724.41 10157.48,1870.08 10188.98,1901.58 10188.98,2000 10169.29,2019.69 v1(10169.29,2196.85)
  MidLayer3 w5: v1(9814.96,1791.34) 9834.65,1771.65 9952.76,1771.65 9972.44,1791.34 v1(10157.48,1791.34)
MEM.BUS_A7: U5.AB18 U24.C3 U25.30 U26.30 U27.18 U28.18 | length 4970.4
  Top Layer w5: v1(9405.51,1814.96) U28.18@9405.51,1866.14 ; v1(9405.51,2519.69) U27.18@9405.51,2570.87 ; U26.30@10200.79,1417.32 v1(10200.79,1468.5) ; U25.30@10200.79,2122.05 v1(10200.79,2173.23) ; v1(11259.84,2157.3) U24.C3@11279.53,2137.62
  Top Layer w7.87: U5.AB18@10165.35,3110.24 v1(10185.04,3090.55)
  MidLayer1 w5: v1(10200.79,2173.23) 10279.56,2094.45 11125.3,2094.45 11207.8,2176.95 11240.19,2176.95 v1(11259.84,2157.3)
  MidLayer2 w5: v1(9405.51,2519.69) 9405.51,2409.45 9393.7,2397.64 9393.7,2188.98 9385.83,2181.1 9385.83,2066.93 9405.51,2047.24 9405.51,1732.28 9393.7,1720.47 9393.7,1484.25 9385.83,1476.38 9385.83,1460.63 9401.57,1444.88 10177.17,1444.88 v1(10200.79,1468.5) 10200.79,1716.54 10212.6,1728.35 10212.6,1799.21 10220.47,1807.09 10220.47,2007.87 10200.79,2027.56 10200.79,2409.45 10212.6,2421.26 10212.6,2503.94 10220.47,2511.81 10220.47,2708.66 10204.72,2724.41 10204.72,2870.08 10204.72,2889.76 10204.72,3070.87 v1(10185.04,3090.55)
MEM.BUS_A8: U5.AB19 U24.A3 U25.31 U26.31 U27.19 U28.19 | length 5266.8
  Top Layer w5: v1(9374.02,1791.34) U28.19@9374.02,1866.14 ; v1(9374.02,2496.06) U27.19@9374.02,2570.87 ; U26.31@10232.28,1417.32 v1(10232.28,1492.13) ; U25.31@10232.28,2122.05 v1(10232.28,2196.85) ; v1(11259.84,2236.04) U24.A3@11279.53,2216.36
  Top Layer w7.87: U5.AB19@10204.72,3110.24 v1(10224.41,3090.55)
  MidLayer2 w5: v1(9374.02,2496.06) 9374.02,2417.32 9354.33,2397.64 9354.33,2188.98 9362.21,2181.1 9362.21,2043.31 9374.02,2031.5 9374.02,1732.28 9354.33,1712.6 9354.33,1484.25 9362.2,1476.38 9362.2,1464.57 9393.7,1433.07 10196.85,1433.07 10232.28,1468.51 10232.28,1716.54 10251.97,1736.22 10251.97,1799.21 10244.1,1807.09 10244.1,2015.75 10232.28,2027.56 10232.28,2397.64 10251.97,2417.32 10251.97,2503.94 10244.09,2511.81 10244.09,2708.66 10263.78,2728.35 10263.78,2842.52 10244.09,2862.21 10244.09,2870.08 10244.09,2889.76 10244.09,3070.87 v1(10224.41,3090.55)
  MidLayer4 w5: v1(10232.28,2196.85) 10232.28,2255.91 10271.65,2295.28 10937.01,2295.28 11094.67,2137.62 11232.28,2137.62 11240.16,2145.49 11240.16,2169.11 11248.03,2176.99 11271.65,2176.99 11279.53,2184.86 11279.53,2216.36 v1(11259.84,2236.04)
MEM.BUS_A9: U5.AB20 U24.B6 U25.32 U26.32 U27.20 U28.20 | length 5681
  Top Layer w5: v1(9342.52,1814.96) U28.20@9342.52,1866.14 ; v1(9342.52,2519.69) U27.20@9342.52,2570.87 ; U26.32@10263.78,1417.32 v1(10263.78,1468.5) ; U25.32@10263.78,2122.05 v1(10263.78,2173.23) ; U24.B6@11397.64,2176.99 v1(11417.32,2196.67)
  Top Layer w7.87: U5.AB20@10244.09,3110.24 v1(10263.78,3090.55)
  MidLayer2 w5: v1(9342.52,2519.69) 9342.52,2409.45 9330.71,2397.64 9330.71,2188.98 9322.84,2181.1 9322.84,2043.31 9342.52,2023.62 9342.52,1732.28 9330.71,1720.47 9330.71,1484.25 9322.83,1476.38 9322.83,1460.63 9362.2,1421.26 10216.54,1421.26 v1(10263.78,1468.5) 10263.78,1716.54 10275.59,1728.35 10275.59,1799.21 10283.47,1807.09 10283.47,2015.75 10263.78,2035.43 10263.78,2393.7 10275.59,2405.51 10275.59,2503.94 10283.46,2511.81 10283.46,2870.08 10283.46,2889.76 10283.46,3070.87 v1(10263.78,3090.55)
  MidLayer3 w5: v1(10263.78,1468.5) 10299.21,1468.5 10346.46,1515.75 10433.07,1515.75 10476.38,1472.44 10495.82,1453 10720.89,1453 11153.54,1885.65 11417.32,1885.65 11437.01,1905.34 11437.01,2176.99 v1(11417.32,2196.67)
MEM.BUS_A10: U5.AB21 U24.A6 U25.33 U26.33 U27.21 U28.21 | length 5522.7
  Top Layer w5: v1(9311.02,1791.34) U28.21@9311.02,1866.14 ; v1(9311.02,2496.06) U27.21@9311.02,2570.87 ; U26.33@10295.28,1417.32 v1(10295.28,1492.13) ; U25.33@10295.28,2122.05 v1(10295.28,2196.85) ; U24.A6@11397.64,2216.36 v1(11417.32,2236.04)
  Top Layer w7.87: U5.AB21@10283.46,3110.24 v1(10303.15,3090.55)
  MidLayer2 w5: v1(9311.02,2496.06) 9311.02,2417.32 9291.34,2397.64 9291.34,2188.98 9299.21,2181.1 9299.21,2027.56 9311.02,2015.75 9311.02,1732.28 9291.34,1712.6 9291.34,1484.25 9299.21,1476.38 9299.21,1464.57 9354.33,1409.45 10236.22,1409.45 10295.28,1468.51 10295.28,1527.56 10283.46,1539.37 10283.46,1704.72 10314.96,1736.22 10314.96,1799.21 10307.09,1807.09 10307.09,2023.62 10295.28,2035.43 10295.28,2078.74 10295.28,2385.83 10314.96,2405.51 10314.96,2503.94 10307.09,2511.81 10307.09,2834.65 10322.83,2850.39 10322.83,2874.02 10322.83,2889.76 10322.83,3070.87 v1(10303.15,3090.55)
  MidLayer4 w5: v1(10295.28,2196.85) 10295.28,2259.84 10318.9,2283.47 10921.26,2283.47 11106.48,2098.25 11271.65,2098.25 11279.53,2106.12 11279.53,2165.18 11291.34,2176.99 11311.02,2176.99 11350.39,2216.36 11350.39,2236.04 11370.08,2255.73 11397.64,2255.73 v1(11417.32,2236.04)
MEM.BUS_A11: U5.AD19 U24.C6 U25.34 U26.34 U27.22 U28.22 | length 5853.5
  Top Layer w5: v1(9279.53,1814.96) U28.22@9279.53,1866.14 ; v1(9279.53,2519.69) U27.22@9279.53,2570.87 ; U26.34@10326.77,1417.32 v1(10326.77,1468.5) ; U25.34@10326.77,2122.05 v1(10326.77,2173.23) ; U24.C6@11397.64,2137.62 v1(11417.32,2157.3)
  Top Layer w7.87: U5.AD19@10204.72,3031.5 v1(10224.41,3011.81)
  MidLayer1 w5: v1(10224.41,3011.81) 10224.41,2889.77 10224.41,2874.02 10224.41,2871.69 10253.78,2842.32 10253.78,2771.45 10307.09,2718.14 10307.09,2511.81 10326.77,2492.13 v1(10326.77,2173.23)
  MidLayer2 w5: v1(9279.53,2519.69) 9279.53,2409.45 9267.72,2397.64 9267.72,2188.98 9259.84,2181.1 9259.84,2031.5 9279.53,2011.81 9279.53,1779.53 9259.84,1759.84 9259.84,1460.63 9322.83,1397.64 10255.91,1397.64 v1(10326.77,1468.5) 10326.77,1519.69 10338.58,1531.5 10338.58,1799.21 10346.46,1807.09 10346.46,2023.62 10326.77,2043.31 v1(10326.77,2173.23)
  MidLayer4 w5: v1(10326.77,1468.5) 10362.2,1468.5 10688.98,1795.28 11488.19,1795.28 11549.68,1856.77 11549.68,2103.69 11515.75,2137.62 11437.01,2137.62 v1(11417.32,2157.3)
MEM.BUS_A12: U5.AE20 U24.D6 U25.22 U26.22 U27.23 U28.23 | length 4854.9
  Top Layer w5: U28.23@9279.53,1417.32 v1(9279.53,1468.5) ; U27.23@9279.53,2122.05 v1(9279.53,2173.23) ; U5.AE20@10244.09,2992.13 10263.78,2972.44 10263.78,2937.01 10283.46,2917.32 10283.46,2684.67 10295.28,2672.86 U25.22@10295.28,2570.87 v1(10295.28,2496.06) ; v1(10295.28,1791.34) U26.22@10295.28,1866.14 ; U24.D6@11397.64,2098.25 v1(11417.32,2117.93)
  MidLayer2 w5: v1(9279.53,1468.5) 9279.53,1716.54 9291.34,1728.35 9291.34,1799.21 9299.21,1807.09 9299.21,2011.81 9279.53,2031.5 v1(9279.53,2173.23) ; v1(10295.28,1791.34) 10295.28,2019.69 10283.47,2031.5 10283.47,2181.1 10275.59,2188.98 10275.59,2370.08 10275.59,2389.76 10295.28,2409.45 v1(10295.28,2496.06)
  MidLayer4 w5: v1(10295.28,1791.34) 10295.28,1814.96 10330.71,1850.39 10555.17,1850.39 10586.67,1818.9 11483.53,1818.9 11529.68,1865.05 11529.68,2070.76 11514,2086.44 11448.82,2086.44 v1(11417.32,2117.93)
  MidLayer3 w5: v1(9291.34,1759.84) 9716.54,1759.84 9740.16,1736.22 10259.84,1736.22 10295.28,1771.65 v1(10295.28,1791.34)
MEM.BUS_A13: U5.AC19 U24.B7 U25.35 U26.35 U27.24 U28.24 | length 5249.9
  Top Layer w5: U28.24@9311.02,1417.32 v1(9311.02,1492.13) ; U27.24@9311.02,2122.05 v1(9311.02,2196.85) ; U26.35@10358.27,1417.32 v1(10358.27,1492.13) ; U25.35@10358.27,2122.05 v1(10358.27,2196.85) ; U24.B7@11437.01,2176.99 v1@11456.69,2196.67
  Top Layer w7.87: U5.AC19@10204.72,3070.87 v1(10224.41,3051.18)
  MidLayer1 w5: v1(10224.41,3051.18) 10244.09,3031.5 10244.09,2889.76 10244.09,2874.02 10244.09,2866.14 10263.78,2846.46 10263.78,2775.59 10346.46,2692.91 10346.46,2511.81 10338.58,2503.94 10338.58,2488.19 10358.27,2468.5 v1(10358.27,2196.85)
  MidLayer2 w5: v1(9311.02,1492.13) 9311.02,1716.54 9330.71,1736.22 9330.71,1799.21 9322.83,1807.09 9322.83,2019.68 9311.02,2031.5 v1(9311.02,2196.85) ; v1(10358.27,1492.13) 10377.95,1511.81 10377.95,1799.21 10370.08,1807.09 10370.08,2031.49 10358.27,2043.31 v1(10358.27,2196.85)
  MidLayer4 w5: v1(10358.27,2196.85) 10358.27,2169.29 10374.02,2153.54 10468.5,2153.54 10559.06,2244.09 10909.45,2244.09 11078.92,2074.63 11299.21,2074.63 11334.65,2110.06 11334.65,2153.37 11358.27,2176.99 11437.01,2176.99 v1(11456.69,2196.67)
  MidLayer3 w5: v1(9311.02,1492.13) 9330.71,1511.81 9389.76,1511.81 9393.7,1507.87 9393.7,1484.25 9385.83,1476.38 9385.83,1460.63 9397.64,1448.82 9799.21,1448.82 9881.89,1531.5 10086.61,1531.5 10169.29,1448.82 10338.58,1448.82 10358.27,1468.5 v1(10358.27,1492.13)
MEM.BUS_A14: U5.AC20 U24.A7 U25.36 U26.36 U27.25 U28.25 | length 5761.5
  Top Layer w5: U28.25@9342.52,1417.32 v1(9342.52,1468.5) 9342.52,1492.13 9456.69,1606.3 9992.13,1606.3 10082.68,1515.75 10370.08,1515.75 10389.76,1496.06 U26.36@10389.76,1417.32 ; U27.25@9342.52,2122.05 v1(9342.52,2173.23) 9342.52,2196.85 9456.69,2311.02 9992.13,2311.02 10066.93,2236.22 10066.93,2078.2 10095.68,2049.45 10368.35,2049.45 10389.76,2070.87 U25.36@10389.76,2122.05 v1(10389.76,2173.23) ; U24.A7@11437.01,2216.36 v1(11456.69,2236.04)
  Top Layer w7.87: U5.AC20@10244.09,3070.87 v1(10263.78,3051.18)
  MidLayer1 w5: v1(10263.78,3051.18) 10283.46,3031.5 10283.46,2889.76 10283.46,2874.02 10283.46,2779.53 10370.08,2692.91 10370.08,2511.81 10389.76,2492.13 v1(10389.76,2173.23)
  MidLayer2 w5: v1(9342.52,1468.5) 9342.52,1716.54 9354.33,1728.35 9354.33,1799.21 9362.2,1807.09 9362.2,2027.56 9342.52,2047.24 v1(9342.52,2173.23)
  MidLayer4 w5: v1(10389.76,2173.23) 10389.76,2196.85 10424.88,2231.96 10448.82,2255.91 10921.26,2255.91 11090.73,2086.44 11295.28,2086.44 11322.83,2114 11322.83,2169.11 11370.08,2216.36 11437.01,2216.36 v1(11456.69,2236.04)
MEM.BUS_A15: U5.AE21 U24.C7 U25.20 U26.20 U27.26 U28.26 | length 5344.8
  Top Layer w5: U28.26@9374.02,1417.32 v1(9374.02,1492.13) ; U27.26@9374.02,2122.05 v1(9374.02,2196.85) ; U5.AE21@10283.46,2992.13 10303.39,2972.21 10303.39,2938.75 10309.68,2932.45 10309.68,2700.45 10358.27,2651.87 U25.20@10358.27,2570.87 v1(10358.27,2496.06) ; v1(10358.27,1791.34) U26.20@10358.27,1866.14 ; U24.C7@11437.01,2137.62 v1(11456.69,2157.3)
  MidLayer2 w5: v1(9208,1357) 9236.83,1385.83 10275.59,1385.83 10346.46,1456.69 10346.46,1476.38 10338.58,1484.25 10338.58,1515.75 10358.27,1535.43 10358.27,2027.56 ; v1(9374.02,1492.13) 9374.02,1716.54 9393.7,1736.22 9393.7,1751.97 9393.7,1799.21 9385.83,1807.09 9385.83,2039.37 9374.02,2051.18 v1(9374.02,2196.85) ; 10358.27,2027.56 10346.46,2039.37 10346.46,2181.1 10338.58,2188.98 10338.58,2377.95 10338.58,2389.76 10358.27,2409.45 v1(10358.27,2496.06)
  MidLayer4 w5: v1(10358.27,2496.06) 10488.19,2366.14 10968.5,2366.14 11039.55,2295.1 11464.57,2295.1 11476.38,2283.29 11476.38,2176.99 v1(11456.69,2157.3)
  MidLayer3 w5: v1(9208,1357) 9299,1357 9374.02,1432.02 v1(9374.02,1492.13)
MEM.BUS_A16: U5.AF21 U24.D7 U25.21 U26.21 U27.27 U28.27 | length 4898.6
  Top Layer w5: U28.27@9405.51,1417.32 v1(9405.51,1468.5) ; U27.27@9405.51,2122.05 v1(9405.51,2173.23) ; U5.AF21@10283.46,2952.76 10283.46,2933.07 10296.68,2919.86 10296.68,2698.01 10326.77,2667.92 U25.21@10326.77,2570.87 v1(10326.77,2519.69) ; v1(10326.77,1814.96) U26.21@10326.77,1866.14 ; U24.D7@11437.01,2098.25 v1(11456.69,2117.93)
  MidLayer2 w5: v1(9405.51,1468.5) 9405.51,1716.54 9417.32,1728.35 9417.32,1799.21 9425.2,1807.09 9425.2,2011.81 9425.2,2051.18 9405.51,2070.87 v1(9405.51,2173.23) ; v1(10311.02,1543.31) 10326.77,1559.06 10326.77,2023.62 10307.09,2043.31 10307.09,2181.1 10314.96,2188.98 10314.96,2385.83 10326.77,2397.64 v1(10326.77,2519.69)
  MidLayer4 w5: v1(10326.77,1814.96) 10350.39,1838.58 10546.55,1838.58 10578.05,1807.09 11485.86,1807.09 11539.68,1860.91 11539.68,2074.9 11516.08,2098.5 11476.13,2098.5 v1(11456.69,2117.93)
  MidLayer3 w5: v1(9405.51,1468.5) 9405.51,1492.13 9484.25,1570.87 10283.46,1570.87 v1(10311.02,1543.31)
MEM.BUS_A17: U5.AC17 U24.E7 U27.42 U28.42 | length 3934.2
  Top Layer w5: U28.42@9877.95,1417.32 v1(9877.95,1492.13) ; U27.42@9877.95,2122.05 v1(9877.95,2196.85) ; U24.E7@11437.01,2058.88 v1(11456.69,2039.19)
  Top Layer w7.87: U5.AC17@10125.98,3070.87 v1(10145.67,3051.18)
  MidLayer1 w5: v1(9877.95,2196.85) 9877.95,2460.72 9942.68,2525.45 9996.76,2525.45 10147.48,2676.18 10147.48,2851.52 10113,2886 10113,2912.21 10125.99,2925.2 10125.99,3031.5 v1(10145.67,3051.18)
  MidLayer2 w5: v1(9877.95,1492.13) 9877.95,1716.54 9897.64,1736.22 9897.64,1799.21 9889.76,1807.09 9889.76,2019.68 9877.95,2031.5 v1(9877.95,2196.85)
  MidLayer3 w5: v1(9877.95,1492.13) 9905.51,1519.69 10084.28,1519.69 10166.96,1437.01 10724.59,1437.01 11161.42,1873.84 11448.82,1873.84 11476.38,1901.4 11476.38,2019.51 v1(11456.69,2039.19)
MEM.BUS_A18: U5.AD17 U24.B3 U27.43 U28.43 | length 3323.1
  Top Layer w5: U28.43@9909.45,1417.32 v1(9909.45,1468.5) ; U27.43@9909.45,2122.05 v1(9909.45,2173.23) ; v1(11259.84,2196.67) U24.B3@11279.53,2176.99
  Top Layer w7.87: U5.AD17@10125.98,3031.5 v1(10145.67,3011.81)
  MidLayer1 w5: v1(9909.45,2173.23) 9909.45,2424 10144.71,2659.27 10157.48,2672.03 10157.48,2905.51 10145.67,2917.32 v1(10145.67,3011.81)
  MidLayer2 w5: v1(9909.45,1468.5) 9909.45,1716.54 9921.26,1728.35 9921.26,1799.21 9929.13,1807.09 9929.13,2027.56 9909.45,2047.24 v1(9909.45,2173.23)
  MidLayer4 w5: v1(9909.45,2173.23) 9909.45,2220.47 9996.06,2307.09 10948.82,2307.09 11078.92,2176.99 11228.35,2176.99 11240.16,2188.8 11240.16,2192.74 11244.09,2196.67 v1(11259.84,2196.67)
MEM.BUS_A19: U5.AC18 U24.C4 U27.44 U28.44 | length 4264.8
  Top Layer w5: U28.44@9940.94,1417.32 v1(9940.94,1492.13) ; U27.44@9940.94,2122.05 v1(9940.94,2196.85) ; v1(11299.21,2157.3) U24.C4@11318.9,2137.62
  Top Layer w7.87: U5.AC18@10165.35,3070.87 v1(10185.04,3051.18)
  MidLayer1 w5: v1(9940.94,2196.85) 9940.94,2379 10204.72,2642.78 10204.72,2874.02 10204.72,2889.76 10204.72,3031.5 v1(10185.04,3051.18)
  MidLayer2 w5: v1(9940.94,1492.13) 9940.94,1716.54 9960.63,1736.22 9960.63,2177.17 v1(9940.94,2196.85)
  MidLayer3 w5: v1(9940.94,1492.13) 9958.5,1509.69 10080.14,1509.69 10164.63,1425.2 10733.38,1425.2 11169.29,1861.11 11169.29,1862.03 11460.63,1862.03 11496.06,1897.46 11496.06,1980.14 11527.56,2011.63 11527.56,2196.67 11507.87,2216.36 11358.27,2216.36 v1(11299.21,2157.3)
MEM.BUS_A20: U5.W23 U24.D5 U27.28 U28.28 | length 5003.1
  Top Layer w5: U28.28@9437.01,1417.32 v1(9437.01,1492.13) ; U27.28@9437.01,2122.05 v1(9437.01,2196.85) ; U24.D5@11358.27,2098.25 v1(11377.95,2117.93)
  Top Layer w7.87: U5.W23@10362.2,3228.35 v1(10381.89,3208.66)
  MidLayer1 w5: v1(10381.89,3208.66) 10401.58,3188.98 10543.31,3188.98 10562.99,3188.98 10622.05,3188.98 10740.16,3070.87 10740.16,2912.69 11346.46,2306.39 11346.46,2149.43 v1(11377.95,2117.93)
  MidLayer2 w5: v1(9437.01,1492.13) 9437.01,1716.54 9456.69,1736.22 9456.69,1751.97 9456.69,1799.21 9448.82,1807.09 9448.82,2059.05 ; v1(9437.01,2196.85) 9437.01,2070.87 9448.82,2059.06
  MidLayer3 w5: v1(9437.01,1492.13) 9503.94,1559.06 10220.47,1559.06 10255.91,1523.62 10318.9,1523.62 10338.58,1543.31 10482,1543.31 10557.31,1468 10716.21,1468 11145.67,1897.46 11389.76,1897.46 11397.64,1905.34 11397.64,2058.88 11377.95,2078.56 v1(11377.95,2117.93)
MEM.BUS_A21: U5.AA24 U24.D4 | length 1581.4
  Top Layer w5: v1(11299.21,2117.93) U24.D4@11318.9,2098.25
  Top Layer w7.87: U5.AA24@10401.58,3149.61 v1(10421.26,3129.92)
  MidLayer1 w5: v1(10421.26,3129.92) 10543.31,3129.92 10562.99,3129.92 10649.61,3129.92 10716.54,3062.99 10716.54,2908.02 11318.9,2305.66 11318.9,2137.62 v1(11299.21,2117.93)
MEM.BUS_A22: U5.W24 U24.C5 | length 1618.6
  Top Layer w5: U24.C5@11358.27,2137.62 v1(11377.95,2157.3)
  Top Layer w7.87: U5.W24@10401.58,3228.35 v1(10421.26,3208.66)
  MidLayer1 w5: v1(10421.26,3208.66) 10543.31,3208.66 10562.99,3208.66 10618.11,3208.66 10751.97,3074.8 10751.97,2915.02 11358.27,2308.72 11358.27,2176.99 v1(11377.95,2157.3)
MEM.BUS_A23: U5.U24 U24.B8 | length 1706.3
  Top Layer w5: U24.B8@11476.38,2176.99 v1(11496.06,2196.67)
  Top Layer w7.87: U5.U24@10401.58,3307.09 v1(10421.26,3287.4)
  MidLayer1 w5: v1(10421.26,3287.4) 10515.99,3287.4 10539.62,3263.78 10610.24,3263.78 10787.4,3086.61 10787.4,2922.01 11428.83,2280.59 11459.33,2280.59 11496.06,2243.86 v1(11496.06,2196.67)
MEM.BUS_A24: U5.V24 U24.C8 | length 1720.2
  Top Layer w5: U24.C8@11476.38,2137.62 v1(11496.06,2157.3)
  Top Layer w7.87: U5.V24@10401.58,3267.72 v1(10421.26,3248.03)
  MidLayer1 w5: v1(10421.26,3248.03) 10482.68,3248.03 10489.26,3241.45 10616.81,3241.45 10775.59,3082.68 10775.59,2919.68 11424.69,2270.59 11455.19,2270.59 11476.38,2249.4 11476.38,2176.99 v1(11496.06,2157.3)
MEM.BUS_D0: U5.AB26 U24.E3 U25.2 U27.7 | length 2983.8
  Top Layer w5: v1(9751.97,2496.06) U27.7@9751.97,2570.87 ; U5.AB26@10480.32,3110.24 10500,3110.24 10507.87,3102.36 10543.31,3102.36 10562.99,3102.36 10673.77,3102.36 10925.2,2850.94 U25.2@10925.2,2570.87 v1(10925.2,2496.06) ; v1(11259.84,2039.19) U24.E3@11279.53,2058.88
  MidLayer3 w5: v1(9751.97,2496.06) 9771.65,2476.38 10503.94,2476.38 10535.43,2507.87 10535.43,2551.18 10559.06,2574.8 10685.04,2574.8 10759.84,2500 10838.58,2500 10854.33,2515.75 10905.51,2515.75 v1(10925.2,2496.06) 11015.75,2496.06 11133.86,2377.95 11133.86,2110.06 11185.04,2058.88 11240.16,2058.88 v1(11259.84,2039.19)
MEM.BUS_D1: U5.AB25 U24.H3 U25.4 U27.8 | length 3127.2
  Top Layer w5: v1(9720.47,2519.69) U27.8@9720.47,2570.87 ; U5.AB25@10440.95,3110.24 10460.63,3090.55 10543.31,3090.55 10562.99,3090.55 10660.58,3090.55 10862.21,2888.93 U25.4@10862.21,2570.87 v1(10862.21,2496.06) ; v1(11259.84,1921.08) U24.H3@11279.53,1940.77
  MidLayer3 w5: v1(9720.47,2519.69) 9720.47,2500 9755.9,2464.57 10511.81,2464.57 10547.24,2500 10547.24,2547.24 10562.99,2562.99 10677.17,2562.99 10716.54,2523.62 10716.54,2488.19 10728.35,2476.38 10842.52,2476.38 v1(10862.21,2496.06) 10881.89,2476.38 11015.75,2476.38 11122.05,2370.08 11122.05,2106.12 11200.79,2027.38 11200.79,1989.98 11210.63,1980.14 11236.22,1980.14 11240.16,1976.2 11240.16,1940.77 v1(11259.84,1921.08)
MEM.BUS_D2: U5.AC26 U24.E4 U25.5 U27.9 | length 3803.1
  Top Layer w5: v1(9688.98,2496.06) U27.9@9688.98,2570.87 ; U5.AC26@10480.32,3070.87 10500,3070.87 10523.62,3047.24 10543.31,3047.24 10562.99,3047.24 10678.78,3047.24 10830.71,2895.31 U25.5@10830.71,2570.87 v1(10830.71,2519.69) 10830.71,2496.06 v1(10862.2,2464.57) ; v1(11299.21,2039.19) U24.E4@11318.9,2058.88
  MidLayer3 w5: v1(9688.98,2496.06) 9590.55,2496.06 9531.5,2555.12 9385.83,2555.12 9374.02,2543.31 9374.02,2523.62 9354.33,2503.94 9354.33,2484.25 9366.14,2472.44 9405.51,2472.44 9488.19,2389.76 9830.71,2389.76 9858.27,2417.32 10814.96,2417.32 v1(10862.2,2464.57) ; v1(10830.71,2519.69) 10854.33,2543.31 10988.19,2543.31 11145.67,2385.83 11145.67,2117.93 11192.91,2070.69 11267.72,2070.69 v1(11299.21,2039.19)
MEM.BUS_D3: U5.AC25 U24.H4 U25.7 U27.10 | length 3235
  Top Layer w5: v1(9657.48,2519.69) U27.10@9657.48,2570.87 ; U5.AC25@10440.95,3070.87 10460.63,3051.18 10500,3051.18 10515.75,3035.43 10547.24,3035.43 10562.99,3035.43 10673.23,3035.43 10685.04,3023.62 10767.72,2940.95 U25.7@10767.72,2570.87 v1(10767.72,2519.69) ; v1(11299.21,1921.08) U24.H4@11318.9,1940.77
  MidLayer3 w5: v1(9657.48,2519.69) 9657.48,2551.18 9673.23,2566.93 10480.32,2566.93 10500,2586.61 10700.79,2586.61 v1(10767.72,2519.69) 10803.15,2555.12 10996.06,2555.12 11168.31,2382.87 11213.53,2382.87 11227.9,2368.5 11227.9,2322 11176.68,2270.78 11176.68,2124.95 11206.68,2094.95 11316.29,2094.95 11340.55,2070.69 11340.55,1962.42 v1(11299.21,1921.08)
MEM.BUS_D4: U5.AD25 U24.H5 U25.8 U27.13 | length 3127.2
  Top Layer w5: U27.13@9562.99,2570.87 v1(9562.99,2496.06) 9590.55,2468.5 9811.02,2468.5 9814.96,2464.57 10704.72,2464.57 v1(10736.22,2496.06) U25.8@10736.22,2570.87 10736.22,2828.78 10635,2930 10635,2989 10612.19,3011.81 10460.63,3011.81 U5.AD25@10440.95,3031.5 ; U24.H5@11358.27,1940.77 v1(11377.95,1921.08)
  MidLayer2 w5: v1(10736.22,2496.06) 11094.67,2137.62 11385.83,2137.62 11397.64,2125.81 11397.64,2110.06 11437.01,2070.69 11437.01,1948.64 11429.13,1940.77 11397.64,1940.77 v1(11377.95,1921.08)
MEM.BUS_D5: U5.AA22 U24.E5 U25.10 U27.14 | length 3626.7
  Top Layer w5: v1(9531.5,2519.69) U27.14@9531.5,2570.87 ; v1(10673.23,2496.06) U25.10@10673.23,2570.87 v1(10673.23,2622.05) ; U24.E5@11358.27,2058.88 v1(11377.95,2039.19)
  Top Layer w7.87: U5.AA22@10322.83,3149.61 v1(10342.52,3129.92)
  MidLayer2 w5: v1(10342.52,3129.92) 10362.21,3110.24 10543.31,3110.24 10566.93,3110.24 10653.54,3110.24 10690.79,3072.99 10690.79,2777.56 10673.23,2760 v1(10673.23,2622.05) ; v1(10673.23,2496.06) 10673.23,2299.21 10834.65,2137.8 11012.54,2137.8 11075.71,2074.63 11342.52,2074.63 v1(11377.95,2039.19)
  MidLayer3 w5: v1(9531.5,2519.69) 9507.87,2543.31 9393.7,2543.31 9385.83,2535.43 9385.83,2511.81 9496.06,2401.58 9822.83,2401.58 9850.39,2429.13 10606.3,2429.13 v1(10673.23,2496.06)
MEM.BUS_D6: U5.AB22 U24.H6 U25.11 U27.15 | length 3633.3
  Top Layer w5: v1(9500,2496.06) U27.15@9500,2570.87 ; v1(10641.73,2519.69) U25.11@10641.73,2570.87 v1(10641.73,2622.05) ; U24.H6@11397.64,1940.77 v1(11417.32,1921.08)
  Top Layer w7.87: U5.AB22@10322.83,3110.24 v1(10342.52,3090.55)
  MidLayer2 w5: v1(10342.52,3090.55) 10362.2,3070.87 10662.17,3070.87 10680.79,3052.24 10680.79,2781.7 10641.73,2742.65 v1(10641.73,2622.05) ; v1(10641.73,2519.69) 10618.11,2496.06 10618.11,2129.92 10696.85,2051.18 10911.42,2051.18 11109.4,1853.2 11349.44,1853.2 v1(11417.32,1921.08)
  MidLayer3 w5: v1(9500,2496.06) 9570.87,2425.2 9807.09,2425.2 9834.65,2452.76 10519.69,2452.76 10559.06,2492.13 10559.06,2535.43 10570.87,2547.24 10614.17,2547.24 v1(10641.73,2519.69)
MEM.BUS_D7: U5.AE24 U24.E6 U25.13 U27.16 | length 2938.5
  Top Layer w5: v1(9468.5,2519.69) U27.16@9468.5,2570.87 ; U5.AE24@10401.58,2992.13 10421.26,2972.44 10421.26,2937.01 10444.88,2913.39 10444.88,2889.76 10444.88,2870.08 10444.88,2759.84 10578.74,2625.99 U25.13@10578.74,2570.87 v1(10578.74,2519.69) ; U24.E6@11397.64,2058.88 v1(11417.32,2039.19)
  MidLayer2 w5: v1(10578.74,2519.69) 10598.42,2539.37 10661.42,2539.37 10696.85,2503.94 10696.85,2481.77 11080.37,2098.25 11389.76,2098.25 11417.32,2070.69 v1(11417.32,2039.19)
  MidLayer3 w5: v1(9468.5,2519.69) 9468.5,2496.06 9551.18,2413.39 9814.96,2413.39 9842.52,2440.95 10527.56,2440.95 10578.74,2492.13 v1(10578.74,2519.69)
MEM.BUS_D8: U5.AC22 U24.F3 U25.42 U27.29 | length 3385
  Top Layer w5: U27.29@9468.5,2122.05 v1(9468.5,2173.23) 9468.5,2196.85 9570.87,2299.21 9988.19,2299.21 10055.12,2232.28 10055.12,2072.02 10088.68,2038.45 10546.33,2038.45 10578.74,2070.87 U25.42@10578.74,2122.05 v1(10578.74,2173.23) ; v1(11259.84,1999.82) U24.F3@11279.53,2019.51
  Top Layer w7.87: U5.AC22@10322.83,3070.87 v1(10342.52,3051.18)
  MidLayer1 w5: v1(10342.52,3051.18) 10362.2,3031.5 10362.2,2996.06 10381.89,2976.38 10381.89,2889.76 10381.89,2870.08 10381.89,2821.24 10515.75,2687.39 10515.75,2555.12 10578.74,2492.13 v1(10578.74,2173.23)
  MidLayer4 w5: v1(10578.74,2173.23) 10625.98,2220.47 10811.02,2220.47 10871.04,2160.45 10939.4,2160.45 11057.04,2042.82 11099.47,2042.82 11162.14,1980.14 11240.16,1980.14 v1(11259.84,1999.82)
MEM.BUS_D9: U5.AD23 U24.G3 U25.44 U27.30 | length 3301
  Top Layer w5: U27.30@9500,2122.05 v1(9500,2196.85) 9590.55,2287.4 9984.25,2287.4 10043.31,2228.35 10043.31,2066.93 10082.68,2027.56 10598.42,2027.56 10641.73,2070.87 U25.44@10641.73,2122.05 v1(10641.73,2173.23) ; v1(11259.84,1960.45) U24.G3@11279.53,1980.14
  Top Layer w7.87: U5.AD23@10362.2,3031.5 v1(10381.89,3011.81)
  MidLayer1 w5: v1(10381.89,3011.81) 10397.64,2996.06 10397.64,2825.11 10566.93,2655.82 10566.93,2562.99 10641.73,2488.19 v1(10641.73,2173.23)
  MidLayer4 w5: v1(10641.73,2173.23) 10675.16,2139.8 10931.77,2139.8 11050.37,2021.2 11092.8,2021.2 11173.23,1940.77 11240.16,1940.77 v1(11259.84,1960.45)
MEM.BUS_D10: U5.AD10 U24.F4 U25.45 U27.31 | length 3532
  Top Layer w5: U27.31@9531.5,2122.05 v1(9531.5,2173.23) 9531.5,2196.85 9610.24,2275.59 9980.32,2275.59 10031.5,2224.41 10031.5,2062.99 10078.74,2015.75 10618.11,2015.75 10673.23,2070.87 U25.45@10673.23,2122.05 v1(10673.23,2196.85) ; v1(11299.21,1999.82) U24.F4@11318.9,2019.51
  Top Layer w7.87: v1(9830.71,3011.81) U5.AD10@9850.39,3031.5
  MidLayer1 w5: v1(9531.5,2173.23) 9531.5,2492.13 9625.98,2586.61 9665.35,2586.61 9818.9,2740.16 9818.9,2870.08 9818.9,2889.76 9818.9,2905.51 9830.71,2917.32 v1(9830.71,3011.81)
  MidLayer2 w5: v1(10673.23,2196.85) 10771.65,2098.43 10996.06,2098.43 11210.59,1883.9 11303.9,1883.9 11318.9,1898.9 11318.9,1980.14 v1(11299.21,1999.82)